# Allegro board 980K2-260817_261115.brd
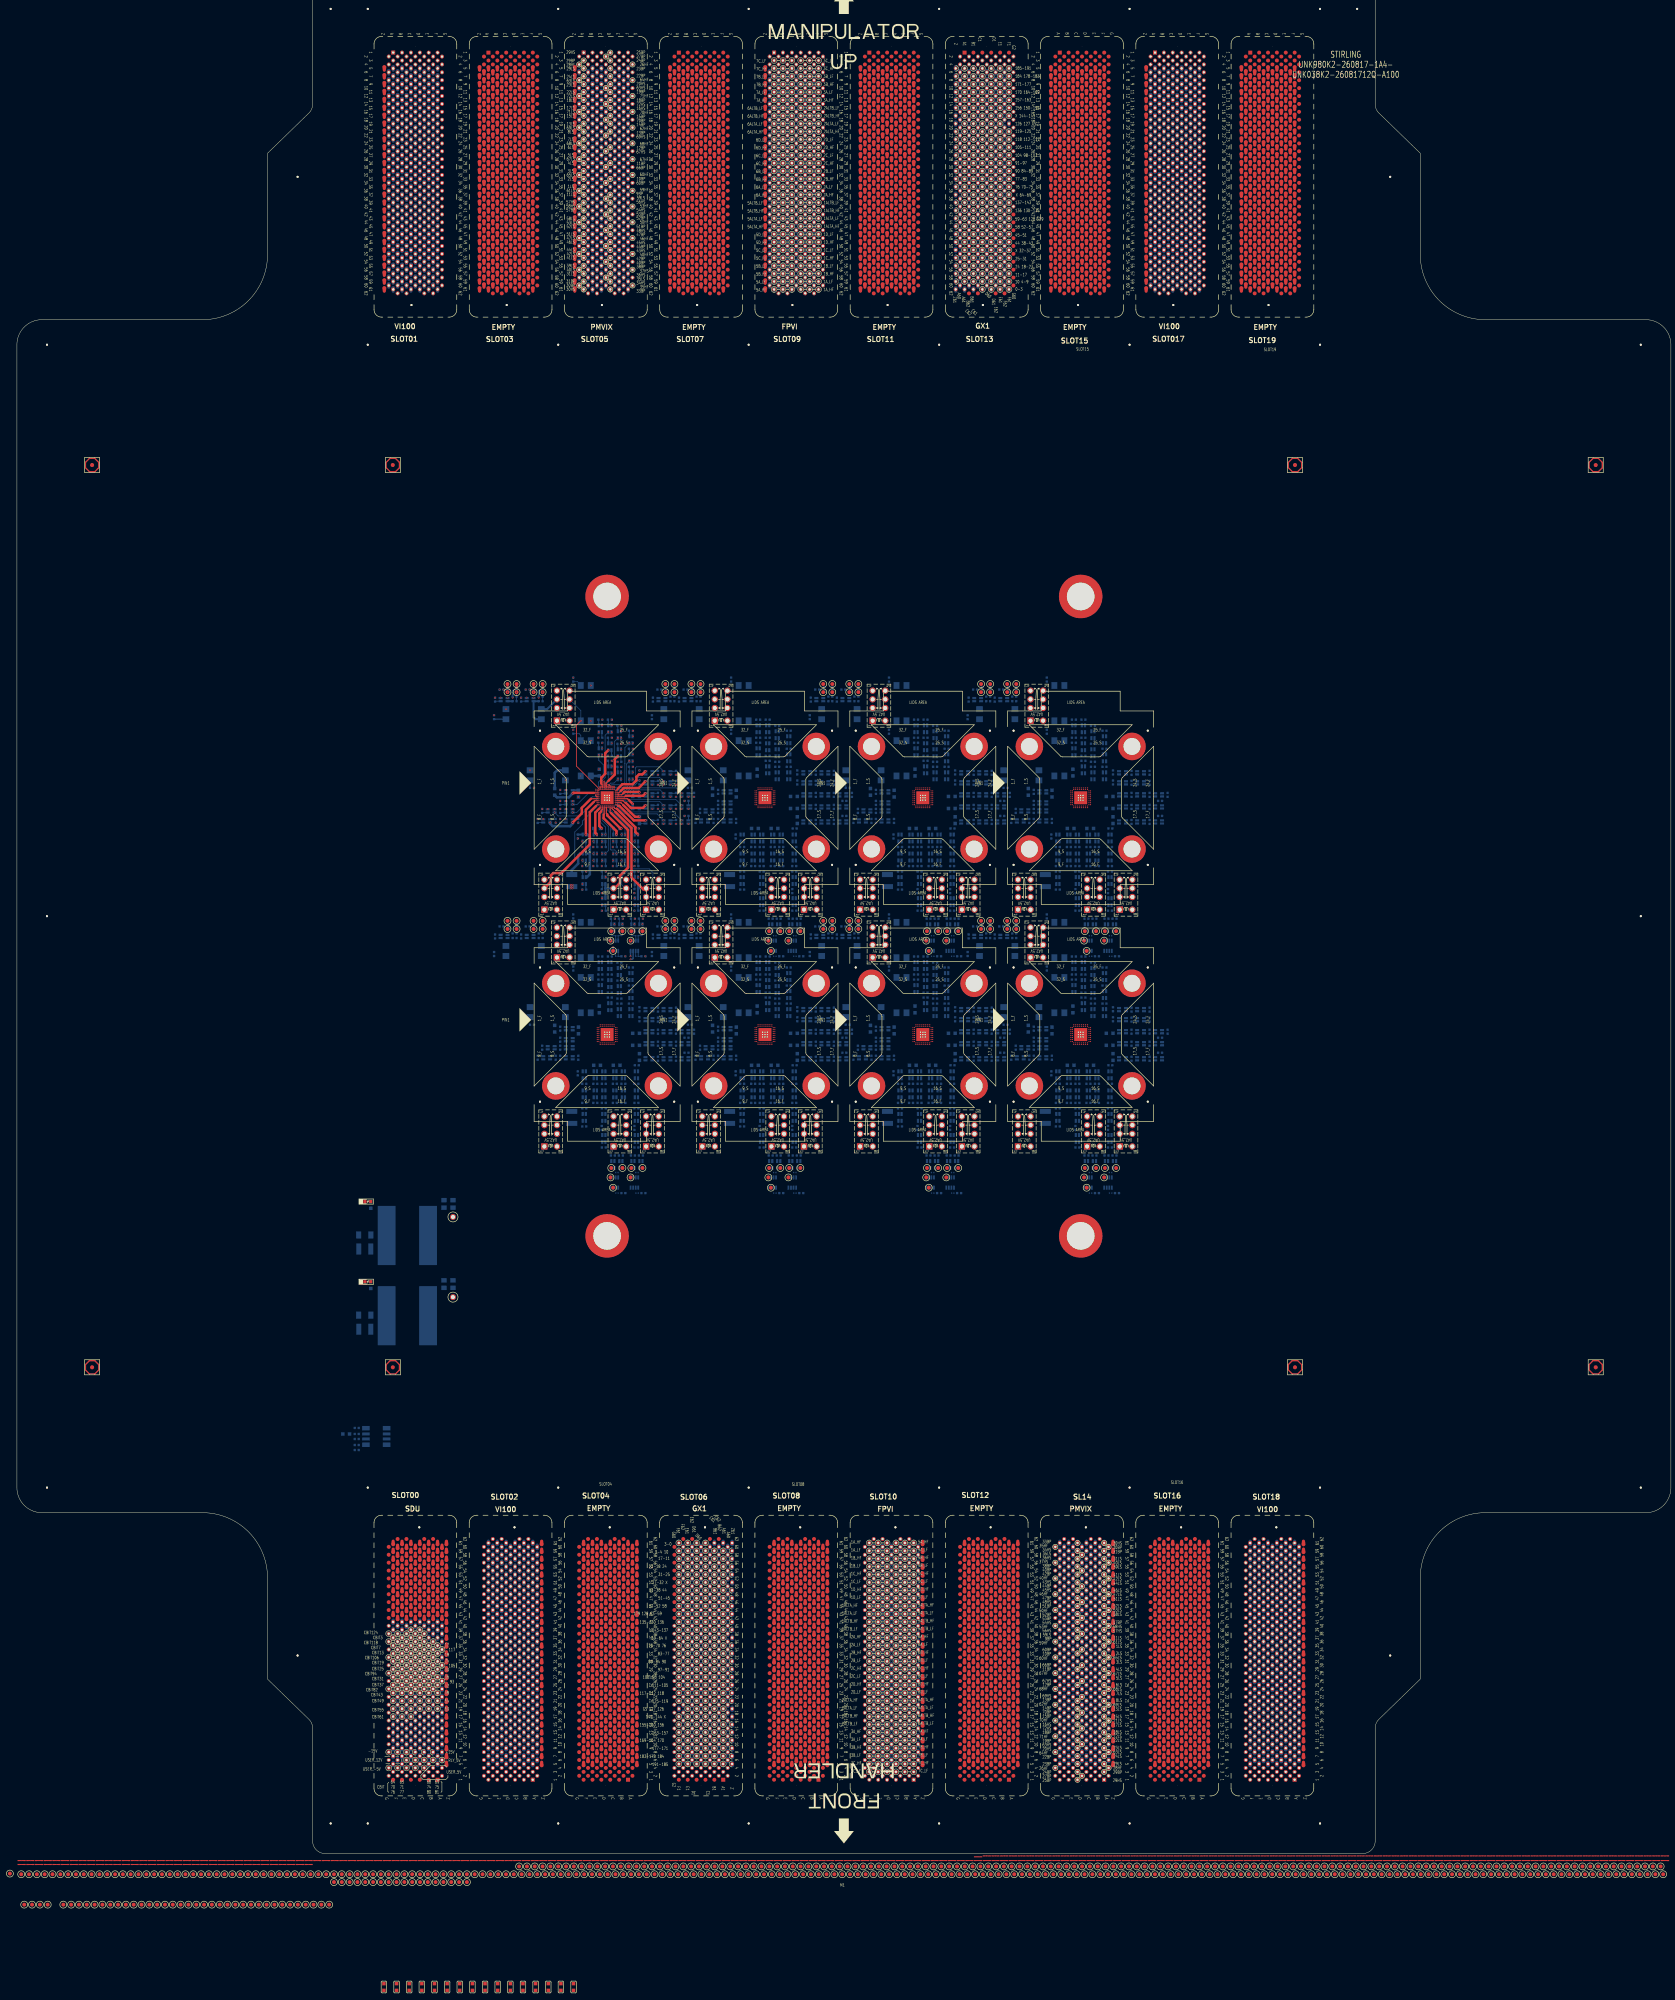
[diagram p0: board, top side]
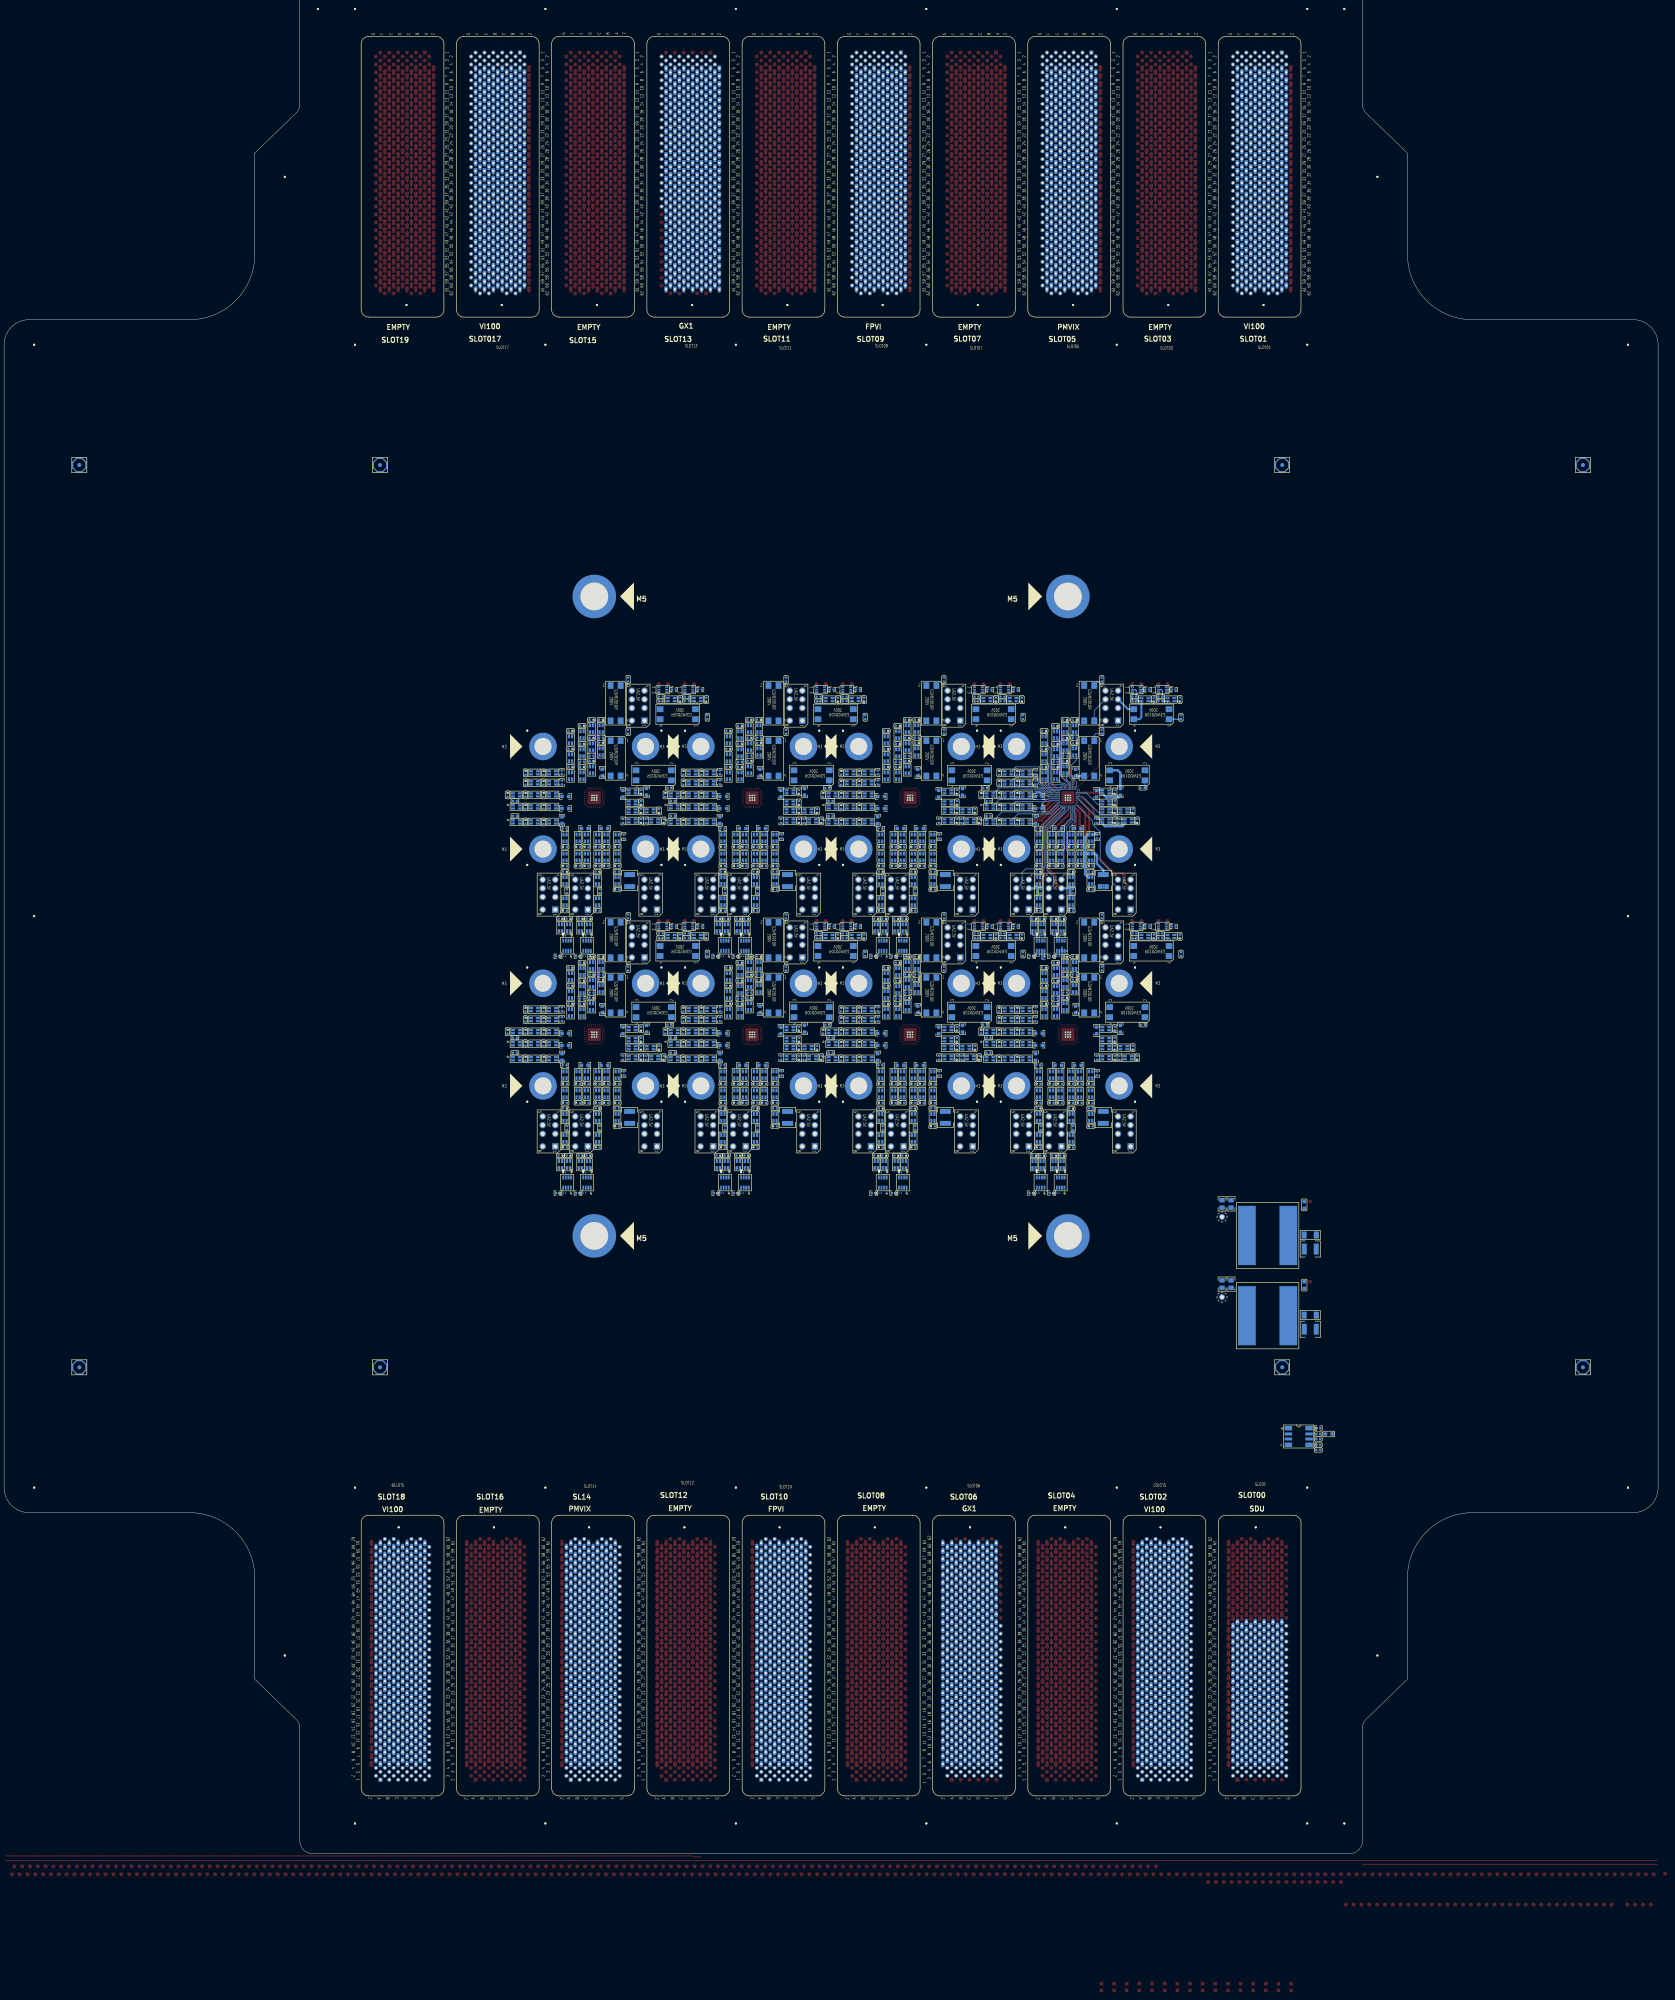
[diagram p1: board, bottom side, seen from below]

Outline 419.1 x 474.98 mm; copper layers: TOP, L02_GND, L03_DP, L04_GND, L05_DP, L06_GND, L07_VI, L08_GND, L09_VI, L10_GND, L11_VI, L12_GND, L13_VI, L14_GND, L15_5V, L16_5V, L17_C-BIT, L18_C-BIT, L19_GND, L20_VI, L21_GND, L22_VI, L23_GND, L24_VI, L25_GND, L26_VI, L27_GND, L28_DP, L29_GND, L30_DP, L31_GND, BOTTOM. Coordinates in mm from the lower left corner of the outline.

## Placement (name value [footprint] x y rotation side)
BC9  0.1U-50-X-S4-TDK  [C0402]  86.11 107.82 180 bottom
BR5  1K-1-S4  [R0402]  86.11 106.3 0 bottom
BR6  1K-1-S4  [R0402]  86.11 103.5 0 bottom
BR7  0-5-S6  [R0603]  83.44 106.3 180 bottom
BR8  0-5-S4  [R0402]  86.11 105.03 180 bottom
BR9  0-5-S4  [R0402]  86.11 102.24 180 bottom
BU1  AT24C512C-SSHM-T-SOIC8  [SO8_206X127MM]  91.06 105.66 180 bottom
C48  0.01U-100-X7R-S6-MU  [C0603]  147.57 273.87 90 bottom
C49  0.01U-100-X7R-S6-MU  [C0603]  136.27 268.99 270 bottom
C50  0.01U-100-X7R-S6-MU  [C0603]  142.28 268.54 270 bottom
C53  1U-16-X5R-S4-YA  [C0402]  142.24 261.62 270 bottom
C54  2.2U-16-X-S4-MU  [C0402]  136.53 261.62 270 bottom
C58  1U-16-X5R-S4-YA  [C0402]  142.11 257.68 270 bottom
C59  4.7U-100-X-SB-MU  [C1210]  140.59 246.51 270 bottom
C60  0.01U-100-X7R-S6-MU  [C0603]  147.01 259.72 0 bottom
C61  0.01U-100-X7R-S6-MU  [C0603]  156.88 264.78 180 bottom
C62  2.2U-16-X-S4-MU  [C0402]  157.07 259.72 0 bottom
C63  0.01U-100-X7R-S6-MU  [C0603]  157.73 261.82 90 bottom
C64  0.01U-100-X7R-S6-MU  [C0603]  156.88 267.82 180 bottom
C65  0.1U-25-X7R-S4-MU  [C0402]  157.73 271.37 90 bottom
C66  0.1U-25-X7R-S4-MU  [C0402]  152.65 276.61 180 bottom
C67  0.1U-25-X7R-S4-MU  [C0402]  150.24 278.13 180 bottom
C68  0.1U-25-X7R-S4-MU  [C0402]  147.83 282.7 180 bottom
C69  0.01U-100-X7R-S6-MU  [C0603]  151.96 259.72 0 bottom
C70  0.1U-25-X7R-S4-MU  [C0402]  122.8 294.89 180 bottom
C71  0.1U-25-X7R-S4-MU  [C0402]  129.42 294.89 180 bottom
C72  0.1U-25-X7R-S4-MU  [C0402]  158.75 227.33 0 bottom
C73  0.1U-25-X7R-S4-MU  [C0402]  153.67 227.33 0 bottom
C74  0.1U-25-X7R-S4-MU  [C0402]  157.73 273.91 90 bottom
CT1  47U-16-X5R-SB-MU  [C1210]  88.14 153.16 180 bottom
CT2  10U-16-X5R-S8-TY  [C0805]  108.2 164.59 90 bottom
CT3  22U-16-X-S8-MU  [C0805]  110.49 164.59 90 bottom
CT7  47U-16-X5R-SB-MU  [C1210]  88.14 132.84 180 bottom
CT8  10U-16-X5R-S8-TY  [C0805]  110.49 144.27 90 bottom
CT9  22U-16-X-S8-MU  [C0805]  108.2 144.27 90 bottom
F1  C1F8-0.25A-SA  [FUSE_1206_H1P05MM]  88.14 156.72 0 bottom
F2  C1F8-0.25A-SA  [FUSE_1206_H1P05MM]  88.14 136.4 0 bottom
FD1  -  [FD_040_V2]  95.25 123.19 0 top
FD2  -  [FD_040_V2]  323.85 123.19 0 top
FD3  -  [FD_040_V2]  323.85 351.79 0 top
FD4  -  [FD_040_V2]  95.25 351.79 0 top
FD5  -  [FD_040_V2]  323.85 123.19 180 bottom
FD6  -  [FD_040_V2]  95.25 123.19 180 bottom
FD7  -  [FD_040_V2]  95.25 351.79 180 bottom
FD8  -  [FD_040_V2]  323.85 351.79 180 bottom
FD9  -  [FD_040_V2]  19.05 123.19 0 top
FD10  -  [FD_040_V2]  400.05 123.19 0 top
FD11  -  [FD_040_V2]  400.05 351.79 0 top
FD12  -  [FD_040_V2]  19.05 351.79 0 top
FD13  -  [FD_040_V2]  400.05 123.19 180 bottom
FD14  -  [FD_040_V2]  19.05 123.19 180 bottom
FD15  -  [FD_040_V2]  19.05 351.79 180 bottom
FD16  -  [FD_040_V2]  400.05 351.79 180 bottom
K1  UA2-5NJ-A-V3  [RL_NECUA2_5V_V3]  138.43 290.63 270 bottom
K2  G3VM-201DR  [RL_G3VM201DR_200V]  144.15 277.5 0 bottom
K3  G3VM-201DR  [RL_G3VM201DR_200V]  134.49 273.18 90 bottom
K4  G3VM-201DR  [RL_G3VM201DR_200V]  144.15 291.47 0 bottom
K5  G3VM-51UR-5V-VSON4  [RL_G3VM_4P_VSON4]  139.95 268.99 0 bottom
K6  G3VM-51UR-5V-VSON4  [RL_G3VM_4P_VSON4]  139.95 266.19 0 bottom
K7  G3VM-51UR-5V-VSON4  [RL_G3VM_4P_VSON4]  139.95 264.16 0 bottom
K8  G3VM-51UR-5V-VSON4  [RL_G3VM_4P_VSON4]  139.95 261.62 0 bottom
K9  G3VM-51UR-5V-VSON4  [RL_G3VM_4P_VSON4]  134.24 261.62 0 bottom
K10  G3VM-51UR-5V-VSON4  [RL_G3VM_4P_VSON4]  135.38 264.16 0 bottom
K11  G3VM-51UR-5V-VSON4  [RL_G3VM_4P_VSON4]  143.76 257.3 90 bottom
K12  G3VM-51UR-5V-VSON4  [RL_G3VM_4P_VSON4]  143.76 252.48 90 bottom
K13  G3VM-51UR-5V-VSON4  [RL_G3VM_4P_VSON4]  143.76 246.51 90 bottom
K14  G3VM-51UR-5V-VSON4  [RL_G3VM_4P_VSON4]  146.56 252.48 90 bottom
K15  UA2-5NJ-A-V3  [RL_NECUA2_5V_V3]  135.25 242.75 270 bottom
K16  G3VM-51UR-5V-VSON4  [RL_G3VM_4P_VSON4]  146.56 257.3 90 bottom
K17  G3VM-51UR-5V-VSON4  [RL_G3VM_4P_VSON4]  148.72 257.3 90 bottom
K18  G3VM-51UR-5V-VSON4  [RL_G3VM_4P_VSON4]  148.72 252.48 90 bottom
K19  G3VM-51UR-5V-VSON4  [RL_G3VM_4P_VSON4]  151.51 257.3 90 bottom
K20  G3VM-51UR-5V-VSON4  [RL_G3VM_4P_VSON4]  151.51 252.48 90 bottom
K21  G3VM-51UR-5V-VSON4  [RL_G3VM_4P_VSON4]  153.67 257.3 90 bottom
K22  G3VM-51UR-5V-VSON4  [RL_G3VM_4P_VSON4]  153.67 252.48 90 bottom
K23  UA2-5NJ-A-V3  [RL_NECUA2_5V_V3]  152.78 242.75 270 bottom
K24  UA2-5NJ-A-V3  [RL_NECUA2_5V_V3]  161.04 242.75 270 bottom
K25  G3VM-51UR-5V-VSON4  [RL_G3VM_4P_VSON4]  156.97 257.3 90 bottom
K26  G3VM-51UR-5V-VSON4  [RL_G3VM_4P_VSON4]  156.97 252.48 90 bottom
K27  G3VM-51UR-5V-VSON4  [RL_G3VM_4P_VSON4]  160.15 261.37 180 bottom
K28  G3VM-51UR-5V-VSON4  [RL_G3VM_4P_VSON4]  164.72 261.37 180 bottom
K29  G3VM-51UR-5V-VSON4  [RL_G3VM_4P_VSON4]  169.29 261.37 180 bottom
K30  G3VM-51UR-5V-VSON4  [RL_G3VM_4P_VSON4]  160.15 265.18 180 bottom
K31  G3VM-51UR-5V-VSON4  [RL_G3VM_4P_VSON4]  164.72 265.18 180 bottom
K32  G3VM-51UR-5V-VSON4  [RL_G3VM_4P_VSON4]  169.29 265.18 180 bottom
K33  G3VM-51UR-5V-VSON4  [RL_G3VM_4P_VSON4]  160.15 268.22 180 bottom
K34  G3VM-51UR-5V-VSON4  [RL_G3VM_4P_VSON4]  164.72 268.22 180 bottom
K35  G3VM-51UR-5V-VSON4  [RL_G3VM_4P_VSON4]  169.29 268.22 180 bottom
K36  G3VM-51UR-5V-VSON4  [RL_G3VM_4P_VSON4]  160.15 271.27 180 bottom
K37  G3VM-51UR-5V-VSON4  [RL_G3VM_4P_VSON4]  164.72 271.27 180 bottom
K38  G3VM-51UR-5V-VSON4  [RL_G3VM_4P_VSON4]  160.15 273.81 180 bottom
K39  G3VM-51UR-5V-VSON4  [RL_G3VM_4P_VSON4]  164.72 273.81 180 bottom
K40  G3VM-51UR-5V-VSON4  [RL_G3VM_4P_VSON4]  155.58 273.05 270 bottom
K41  G3VM-51UR-5V-VSON4  [RL_G3VM_4P_VSON4]  155.58 277.62 270 bottom
K42  G3VM-51UR-5V-VSON4  [RL_G3VM_4P_VSON4]  155.58 282.19 270 bottom
K43  G3VM-51UR-5V-VSON4  [RL_G3VM_4P_VSON4]  152.65 273.05 270 bottom
K44  G3VM-51UR-5V-VSON4  [RL_G3VM_4P_VSON4]  152.65 278.89 270 bottom
K45  G3VM-51UR-5V-VSON4  [RL_G3VM_4P_VSON4]  152.65 283.46 270 bottom
K46  G3VM-51UR-5V-VSON4  [RL_G3VM_4P_VSON4]  150.24 274.57 270 bottom
K47  G3VM-51UR-5V-VSON4  [RL_G3VM_4P_VSON4]  150.24 280.42 270 bottom
K48  G3VM-51UR-5V-VSON4  [RL_G3VM_4P_VSON4]  150.24 284.99 270 bottom
K49  G3VM-51UR-5V-VSON4  [RL_G3VM_4P_VSON4]  147.83 284.99 270 bottom
K50  G3VM-51UR-5V-VSON4  [RL_G3VM_4P_VSON4]  147.83 279.15 270 bottom
K51  G3VM-51UR-5V-VSON4  [RL_G3VM_4P_VSON4]  148.72 246.51 270 bottom
K52  G3VM-51UR-5V-VSON4  [RL_G3VM_4P_VSON4]  148.72 241.17 90 bottom
K53  G3VM-51UR-5V-VSON4  [RL_G3VM_4P_VSON4]  156.97 246.51 270 bottom
K54  G3VM-51UR-5V-VSON4  [RL_G3VM_4P_VSON4]  156.97 241.17 90 bottom
K55  G3VM-51UR-5V-VSON4  [RL_G3VM_4P_VSON4]  123.44 292.35 0 bottom
K56  G3VM-201DR  [RL_G3VM201DR_200V]  128.4 288.67 90 bottom
K57  G3VM-51UR-5V-VSON4  [RL_G3VM_4P_VSON4]  158.12 234.57 270 bottom
K58  G3VM-51UR-5V-VSON4  [RL_G3VM_4P_VSON4]  156.08 234.57 270 bottom
K59  G3VM-51UR-5V-VSON4  [RL_G3VM_4P_VSON4]  153.04 234.57 270 bottom
K60  G3VM-51UR-5V-VSON4  [RL_G3VM_4P_VSON4]  151 234.57 270 bottom
K61  G3VM-51UR-5V-VSON4  [RL_G3VM_4P_VSON4]  130.05 292.35 0 bottom
LD1  LDG-2-S6  [LED_0603]  88.91 165.19 0 top
LD3  LDG-2-S6  [LED_0603]  88.91 144.87 0 top
LT1  L10U-16A-S16.5X15.5-PU  [IND_16P5X15P5MM]  98.93 156.59 0 bottom
LT3  L10U-16A-S16.5X15.5-PU  [IND_16P5X15P5MM]  98.93 136.27 0 bottom
M1  PG_LTXDX_F_X1_OUTLINE_TD_V2  [PG_LTXDX_F_X1_OUTLINE_TD_COHU]  209.55 237.49 0 top
NOREF  -  []  233.98 238.07 0 top
NOREF#2  -  []  199.27 261.77 0 top
NOREF#3  -  []  259.08 208.59 0 top
NOREF#4  -  []  228.32 193.35 0 top
NOREF#5  -  []  255.02 208.14 90 top
NOREF#6  -  []  254.43 292.23 0 top
NOREF#7  -  []  231.18 179.15 0 top
NOREF#8  -  []  270.56 197.6 0 top
NOREF#9  -  []  245.04 233.3 90 top
NOREF#10  -  []  233.18 184.35 0 top
NOREF#11  -  []  152.63 233.69 90 top
NOREF#12  -  []  153.18 222.26 90 top
NOREF#13  -  []  258.35 264.47 0 top
NOREF#14  -  []  196.02 252.78 0 top
NOREF#15  -  []  267.77 197.6 0 top
NOREF#16  -  []  254.43 232.23 0 top
NOREF#17  -  []  214.38 264.09 0 top
NOREF#18  -  []  232.25 278.02 0 top
NOREF#19  -  []  277.71 173.69 0 top
NOREF#20  -  []  156.8 225.06 90 top
NOREF#21  -  []  183.49 193.03 90 top
NOREF#22  -  []  188.35 217.95 90 top
NOREF#23  -  []  150.6 173.69 0 top
NOREF#24  -  []  201.12 188.11 90 top
NOREF#25  -  []  180.95 204.09 90 top
NOREF#26  -  []  152.25 278.02 0 top
NOREF#27  -  []  159.27 260.97 90 top
NOREF#28  -  []  212.55 190.49 90 top
NOREF#29  -  []  184.16 196.43 90 top
NOREF#30  -  []  195.92 190.88 90 top
NOREF#31  -  []  187.03 231.4 0 top
NOREF#32  -  []  127.98 226.38 90 top
NOREF#33  -  []  259.73 178.35 0 top
NOREF#34  -  []  80.49 135.25 0 top
NOREF#35  -  []  283.84 211.67 0 top
NOREF#36  -  []  228.44 257.85 90 top
NOREF#37  -  []  199.72 283.79 90 top
NOREF#38  -  []  163.92 229.94 0 top
NOREF#39  -  []  228.32 185.63 0 top
NOREF#40  -  []  216.26 263.76 90 top
NOREF#41  -  []  276.57 245.63 0 top
NOREF#42  -  []  151.79 256.75 0 top
NOREF#43  -  []  152.25 222.59 90 top
NOREF#44  -  []  258.85 181.15 90 top
NOREF#45  -  []  239.27 274.21 0 top
NOREF#46  -  []  209.52 264.23 90 top
NOREF#47  -  []  276.81 232.54 0 top
NOREF#48  -  []  272.66 166.36 90 top
NOREF#49  -  []  190.77 283.79 90 top
NOREF#50  -  []  154.39 226.59 90 top
NOREF#51  -  []  236.54 167 0 top
NOREF#52  -  []  192.25 212.18 0 top
NOREF#53  -  []  154.51 259.27 90 top
NOREF#54  -  []  124.44 292.28 90 top
NOREF#55  -  []  154.07 191.6 90 top
NOREF#56  -  []  279.65 272.56 0 top
NOREF#57  -  []  281.44 244.35 0 top
NOREF#58  -  []  156.57 245.63 0 top
NOREF#59  -  []  136.55 220.49 0 top
NOREF#60  -  []  251.05 289.49 0 top
NOREF#61  -  []  253.64 239.09 0 top
NOREF#62  -  []  189.84 284.11 0 top
NOREF#63  -  []  223.36 253.35 0 top
NOREF#64  -  []  186.7 283.04 90 top
NOREF#65  -  []  136.98 205.11 90 top
NOREF#66  -  []  271.71 171.3 0 top
NOREF#67  -  []  219.73 178.35 0 top
NOREF#68  -  []  156.81 172.54 0 top
NOREF#69  -  []  216.55 280.49 0 top
NOREF#70  -  []  197.37 251.6 90 top
NOREF#71  -  []  84.45 359.42 0 top
NOREF#72  -  []  202.44 232.28 0 top
NOREF#73  -  []  239.27 271.67 0 top
NOREF#74  -  []  249.52 272.86 90 top
NOREF#75  -  []  158.89 259.3 0 top
NOREF#76  -  []  186.16 212.17 90 top
NOREF#77  -  []  266.28 253.03 90 top
NOREF#78  -  []  182.81 257.6 0 top
NOREF#79  -  []  224.04 196.75 0 top
NOREF#80  -  []  222.87 273.02 0 top
NOREF#81  -  []  276.52 276.55 0 top
NOREF#82  -  []  173.65 179.15 0 top
NOREF#83  -  []  155.17 272.17 90 top
NOREF#84  -  []  253.62 289.09 90 top
NOREF#85  -  []  151.11 198.18 0 top
NOREF#86  -  []  157.59 235.77 0 top
NOREF#87  -  []  180.83 263.76 90 top
NOREF#88  -  []  163.84 201.77 0 top
NOREF#89  -  []  269.24 185.31 90 top
NOREF#90  -  []  145.42 226.99 90 top
NOREF#91  -  []  138.97 271.91 90 top
NOREF#92  -  []  159.4 214.54 0 top
NOREF#93  -  []  270.41 228.7 90 top
NOREF#94  -  []  189.12 240.3 90 top
NOREF#95  -  []  186.7 237.02 90 top
NOREF#96  -  []  194.39 222.02 90 top
NOREF#97  -  []  128.94 265.53 0 top
NOREF#98  -  []  288.42 201.77 0 top
NOREF#99  -  []  152.25 218.02 0 top
NOREF#100  -  []  226.01 195.7 90 top
NOREF#101  -  []  286.32 212.22 0 top
NOREF#102  -  []  264.26 456.29 0 top
NOREF#103  -  []  321.52 456.29 0 top
NOREF#104  -  []  149.12 191.6 90 top
NOREF#105  -  []  230.77 273.37 90 top
NOREF#106  -  []  140.83 208.59 90 top
NOREF#107  -  []  284.95 267.27 90 top
NOREF#108  -  []  157.18 176.17 90 top
NOREF#109  -  []  267.43 224.11 90 top
NOREF#110  -  []  227.45 209.24 0 top
NOREF#111  -  []  226.16 226.14 90 top
NOREF#112  -  []  159.4 210.55 90 top
NOREF#113  -  []  277.25 256.75 0 top
NOREF#114  -  []  135.11 201.22 90 top
NOREF#115  -  []  147.43 218.27 90 top
NOREF#116  -  []  159.4 268.95 0 top
NOREF#117  -  []  266.16 200.17 90 top
NOREF#118  -  []  272.63 173.69 90 top
NOREF#119  -  []  148.32 182.05 0 top
NOREF#120  -  []  197.37 240.3 90 top
NOREF#121  -  []  232.63 172.86 0 top
NOREF#122  -  []  189.67 250.01 0 top
NOREF#123  -  []  203.84 214.21 0 top
NOREF#124  -  []  86.61 153.16 0 top
NOREF#125  -  []  209.52 204.23 90 top
NOREF#126  -  []  276.52 281.12 0 top
NOREF#127  -  []  191.79 256.75 0 top
NOREF#128  -  []  150.56 252.5 0 top
NOREF#129  -  []  149.12 196.43 90 top
NOREF#130  -  []  151.95 178.07 0 top
NOREF#131  -  []  294.09 207.27 90 top
NOREF#132  -  []  244.95 270.32 90 top
NOREF#133  -  []  211.21 234.24 90 top
NOREF#134  -  []  275.05 278.82 0 top
NOREF#135  -  []  162.87 16.49 0 top
NOREF#136  -  []  147.45 269.24 0 top
NOREF#137  -  []  187.8 205.39 90 top
NOREF#138  -  []  158.04 228.3 0 top
NOREF#139  -  []  232.25 272.17 0 top
NOREF#140  -  []  267.43 224.11 0 top
NOREF#141  -  []  187.01 458.49 0 top
NOREF#142  -  []  233.83 172.21 90 top
NOREF#143  -  []  212.64 204.47 0 top
NOREF#144  -  []  152.51 235.77 0 top
NOREF#145  -  []  275.92 255.7 90 top
NOREF#146  -  []  235.92 250.88 90 top
NOREF#147  -  []  148.99 191.93 0 top
NOREF#148  -  []  168.94 221.73 0 top
NOREF#149  -  []  129.17 291.95 0 top
NOREF#150  -  []  139.08 265.79 0 top
NOREF#151  -  []  152.61 456.29 0 top
NOREF#152  -  []  266.16 198.18 0 top
NOREF#153  -  []  201.75 274.76 0 top
NOREF#154  -  []  279.4 202.09 0 top
NOREF#155  -  []  157.71 233.69 90 top
NOREF#156  -  []  89.76 144.42 90 top
NOREF#157  -  []  276.7 181.72 90 top
NOREF#158  -  []  233.39 253.03 90 top
NOREF#159  -  []  191.19 228.49 0 top
NOREF#160  -  []  218.95 268.91 0 top
NOREF#161  -  []  204.32 291.95 90 top
NOREF#162  -  []  167.04 299.09 0 top
NOREF#163  -  []  147.05 209.24 0 top
NOREF#164  -  []  121.84 235.2 0 top
NOREF#165  -  []  231.19 278.07 0 top
NOREF#166  -  []  139.55 294.49 0 top
NOREF#167  -  []  163.84 208.62 0 top
NOREF#168  -  []  209.55 237.49 0 top
NOREF#169  -  []  239.44 179.15 0 top
NOREF#170  -  []  228.32 242.05 0 top
NOREF#171  -  []  281.12 248.11 90 top
NOREF#172  -  []  228.19 187.71 0 top
NOREF#173  -  []  179.55 234.49 0 top
NOREF#174  -  []  146.28 197.85 90 top
NOREF#175  -  []  281.12 188.11 90 top
NOREF#176  -  []  216.63 292.23 0 top
NOREF#177  -  []  226.96 191.6 90 top
NOREF#178  -  []  152.72 252.5 0 top
NOREF#179  -  []  216.83 227.03 0 top
NOREF#180  -  []  203.84 260.97 90 top
NOREF#181  -  []  275.56 235.77 0 top
NOREF#182  -  []  233.18 244.35 0 top
NOREF#183  -  []  89.74 155.92 0 top
NOREF#184  -  []  163.84 273.41 90 top
NOREF#185  -  []  158.91 172.21 90 top
NOREF#186  -  []  264.16 185.63 90 top
NOREF#187  -  []  236.79 171.3 0 top
NOREF#188  -  []  244.95 267.27 90 top
NOREF#189  -  []  147.8 205.39 90 top
NOREF#190  -  []  243.97 200.64 90 top
NOREF#191  -  []  218.35 264.47 0 top
NOREF#192  -  []  154.63 286.99 0 top
NOREF#193  -  []  193.18 222.26 90 top
NOREF#194  -  []  144.04 245.96 0 top
NOREF#195  -  []  116.51 14.59 90 top
NOREF#196  -  []  178.95 201.55 0 top
NOREF#197  -  []  279.4 268.95 0 top
NOREF#198  -  []  246.32 269.17 0 top
NOREF#199  -  []  190.41 228.7 90 top
NOREF#200  -  []  123.4 281.8 0 top
NOREF#201  -  []  260.43 224.38 90 top
NOREF#202  -  []  195.68 233.69 90 top
NOREF#203  -  []  249.52 267.27 90 top
NOREF#204  -  []  89.74 155.92 90 top
NOREF#205  -  []  154.07 251.6 90 top
NOREF#206  -  []  273.94 256.75 0 top
NOREF#207  -  []  186.16 200.17 90 top
NOREF#208  -  []  283.97 205.9 0 top
NOREF#209  -  []  236.79 231.3 0 top
NOREF#210  -  []  226.43 236.47 90 top
NOREF#211  -  []  288.39 456.29 0 top
NOREF#212  -  []  129.49 220.89 0 top
NOREF#213  -  []  246.32 262.32 0 top
NOREF#214  -  []  275.92 190.88 90 top
NOREF#215  -  []  272.13 284.66 0 top
NOREF#216  -  []  145.61 252.5 0 top
NOREF#217  -  []  199.27 207.82 90 top
NOREF#218  -  []  187.43 278.27 0 top
NOREF#219  -  []  265.61 252.78 0 top
NOREF#220  -  []  205.38 286.23 0 top
NOREF#221  -  []  240.11 18.69 0 top
NOREF#222  -  []  187.77 197.6 0 top
NOREF#223  -  []  188.99 180.62 0 top
NOREF#224  -  []  231.79 251.93 0 top
NOREF#225  -  []  196.33 167.9 90 top
NOREF#226  -  []  234.07 191.6 90 top
NOREF#227  -  []  193.83 172.21 90 top
NOREF#228  -  []  234.39 216.17 90 top
NOREF#229  -  []  235.92 190.88 90 top
NOREF#230  -  []  209.55 237.49 0 top
NOREF#231  -  []  153.6 216.55 0 top
NOREF#232  -  []  275.58 202.67 90 top
NOREF#233  -  []  141.55 209.94 90 top
NOREF#234  -  []  227.43 284.11 90 top
NOREF#235  -  []  219.08 205.79 0 top
NOREF#236  -  []  278.13 389.27 90 top
NOREF#237  -  []  161.75 269.17 0 top
NOREF#238  -  []  186.96 251.6 90 top
NOREF#239  -  []  191.19 283.92 0 top
NOREF#240  -  []  248.94 281.73 0 top
NOREF#241  -  []  78.11 0 90 top
NOREF#242  -  []  109.54 14.59 90 top
NOREF#243  -  []  265.09 197.49 90 top
NOREF#244  -  []  248.42 208.62 0 top
NOREF#245  -  []  182.81 197.6 0 top
NOREF#246  -  []  269.72 226.19 0 top
NOREF#247  -  []  323.77 454.29 90 top
NOREF#248  -  []  283.97 202.09 0 top
NOREF#249  -  []  184.04 191.93 0 top
NOREF#250  -  []  193.56 233.37 90 top
NOREF#251  -  []  290.89 266.13 0 top
NOREF#252  -  []  271.91 191.6 90 top
NOREF#253  -  []  243.4 296.38 0 top
NOREF#254  -  []  221.55 262.57 90 top
NOREF#255  -  []  151.79 196.75 0 top
NOREF#256  -  []  268.78 184.35 0 top
NOREF#257  -  []  214.09 200.42 90 top
NOREF#258  -  []  134.51 203.76 0 top
NOREF#259  -  []  283.84 268.62 0 top
NOREF#260  -  []  230.56 252.78 0 top
NOREF#261  -  []  264.04 185.96 0 top
NOREF#262  -  []  143.89 185.24 90 top
NOREF#263  -  []  231.24 193.03 90 top
NOREF#264  -  []  174.04 270.63 90 top
NOREF#265  -  []  149.67 247.68 90 top
NOREF#266  -  []  243.84 207.82 90 top
NOREF#267  -  []  271.79 191.93 0 top
NOREF#268  -  []  178.35 209.04 0 top
NOREF#269  -  []  169.52 272.86 90 top
NOREF#270  -  []  256.83 287.03 0 top
NOREF#271  -  []  180.83 268.59 90 top
NOREF#272  -  []  239.4 273.09 90 top
NOREF#273  -  []  162.88 458.49 0 top
NOREF#274  -  []  235.96 228.6 90 top
NOREF#275  -  []  190.15 206.89 90 top
NOREF#276  -  []  164.95 272.86 90 top
NOREF#277  -  []  144.04 251.93 0 top
NOREF#278  -  []  256.98 265.11 90 top
NOREF#279  -  []  163.84 213.41 90 top
NOREF#280  -  []  213.24 201.55 0 top
NOREF#281  -  []  193.76 190.88 90 top
NOREF#282  -  []  143.61 396.29 0 top
NOREF#283  -  []  168.42 265.58 0 top
NOREF#284  -  []  151.79 191.93 0 top
NOREF#285  -  []  199.4 272 0 top
NOREF#286  -  []  283.97 214.54 0 top
NOREF#287  -  []  254 14.59 90 top
NOREF#288  -  []  213.64 239.09 0 top
NOREF#289  -  []  148.32 245.63 0 top
NOREF#290  -  []  195.17 212.18 0 top
NOREF#291  -  []  141.6 248.12 0 top
NOREF#292  -  []  199.27 273.41 90 top
NOREF#293  -  []  193.27 193.35 0 top
NOREF#294  -  []  255.65 244.35 0 top
NOREF#295  -  []  243.97 267.5 90 top
NOREF#296  -  []  232.25 212.18 90 top
NOREF#297  -  []  276.57 185.63 0 top
NOREF#298  -  []  153.18 211.85 90 top
NOREF#299  -  []  216.98 265.11 90 top
NOREF#300  -  []  268.78 282.65 0 top
NOREF#301  -  []  148.81 195.7 90 top
NOREF#302  -  []  189.12 180.3 90 top
NOREF#303  -  []  188.99 191.93 0 top
NOREF#304  -  []  233.56 233.37 90 top
NOREF#305  -  []  205.04 293.3 90 top
NOREF#306  -  []  193.39 253.03 90 top
NOREF#307  -  []  248.42 200.97 90 top
NOREF#308  -  []  118.64 291.4 0 top
NOREF#309  -  []  193.76 250.88 90 top
NOREF#310  -  []  190.56 192.78 0 top
NOREF#311  -  []  144.04 196.75 0 top
NOREF#312  -  []  193.56 173.37 90 top
NOREF#313  -  []  266.69 283.04 90 top
NOREF#314  -  []  219.08 201.22 0 top
NOREF#315  -  []  106.68 128.02 90 top
NOREF#316  -  []  203.84 270.87 90 top
NOREF#317  -  []  135.15 260.67 0 top
NOREF#318  -  []  275.49 18.69 90 top
NOREF#319  -  []  271.79 196.75 0 top
NOREF#320  -  []  156.79 231.3 0 top
NOREF#321  -  []  173.24 201.55 0 top
NOREF#322  -  []  133.36 201.22 0 top
NOREF#323  -  []  209.55 237.49 0 top
NOREF#324  -  []  223.36 198.18 0 top
NOREF#325  -  []  289.52 212.86 90 top
NOREF#326  -  []  279.22 179.57 90 top
NOREF#327  -  []  211.25 184.35 0 top
NOREF#328  -  []  279.24 184.35 0 top
NOREF#329  -  []  273.98 178.07 0 top
NOREF#330  -  []  268.99 196.75 0 top
NOREF#331  -  []  208.54 207.5 90 top
NOREF#332  -  []  243.97 264.45 90 top
NOREF#333  -  []  248.54 205.9 0 top
NOREF#334  -  []  157.74 226.35 90 top
NOREF#335  -  []  155.05 223.39 0 top
NOREF#336  -  []  289.52 200.42 90 top
NOREF#337  -  []  237.25 196.75 0 top
NOREF#338  -  []  199.27 271.67 0 top
NOREF#339  -  []  161.44 184.35 0 top
NOREF#340  -  []  236.57 253.35 0 top
NOREF#341  -  []  234.39 282.02 90 top
NOREF#342  -  []  178.85 241.15 90 top
NOREF#343  -  []  273.6 226.96 0 top
NOREF#344  -  []  256.55 194.49 90 top
NOREF#345  -  []  243.84 204.78 90 top
NOREF#346  -  []  252.55 250.49 90 top
NOREF#347  -  []  229.84 213.7 90 top
NOREF#348  -  []  233.6 282.39 0 top
NOREF#349  -  []  269.84 213.7 90 top
NOREF#350  -  []  269.84 279.54 0 top
NOREF#351  -  []  134.43 292.23 0 top
NOREF#352  -  []  221.6 17.15 0 top
NOREF#353  -  []  156.61 233.37 90 top
NOREF#354  -  []  192.72 252.78 0 top
NOREF#355  -  []  178.35 264.47 0 top
NOREF#356  -  []  224.04 251.93 0 top
NOREF#357  -  []  227.99 238.35 0 top
NOREF#358  -  []  150.98 244.35 0 top
NOREF#359  -  []  203.04 176.5 90 top
NOREF#360  -  []  186.96 196.43 90 top
NOREF#361  -  []  188.99 256.75 0 top
NOREF#362  -  []  275.58 262.67 90 top
NOREF#363  -  []  169.05 232.28 0 top
NOREF#364  -  []  318.12 17.15 90 top
NOREF#365  -  []  228.44 241.72 90 top
NOREF#366  -  []  163.97 200.64 90 top
NOREF#367  -  []  269.55 188.99 90 top
NOREF#368  -  []  267.77 241.47 0 top
NOREF#369  -  []  166.32 209.17 0 top
NOREF#370  -  []  215.84 202.57 90 top
NOREF#371  -  []  134.43 232.23 0 top
NOREF#372  -  []  312.52 456.29 0 top
NOREF#373  -  []  236.38 241.15 90 top
NOREF#374  -  []  141.6 234.15 0 top
NOREF#375  -  []  272.25 218.02 90 top
NOREF#376  -  []  267.05 209.24 0 top
NOREF#377  -  []  216.38 264.09 90 top
NOREF#378  -  []  199.4 200.64 90 top
NOREF#379  -  []  159.65 212.56 0 top
NOREF#380  -  []  253.45 244.35 0 top
NOREF#381  -  []  159.4 207.5 90 top
NOREF#382  -  []  274.33 264.33 90 top
NOREF#383  -  []  199.4 274.54 0 top
NOREF#384  -  []  244.32 231.95 90 top
NOREF#385  -  []  267.3 220.35 0 top
NOREF#386  -  []  243.84 213.41 90 top
NOREF#387  -  []  277.71 233.69 90 top
NOREF#388  -  []  243.84 200.97 90 top
NOREF#389  -  []  168.42 260.97 90 top
NOREF#390  -  []  215.84 262.57 90 top
NOREF#391  -  []  236.57 245.63 90 top
NOREF#392  -  []  283.97 212 0 top
NOREF#393  -  []  239.27 205.58 0 top
NOREF#394  -  []  199.27 210.87 90 top
NOREF#395  -  []  273.94 191.93 0 top
NOREF#396  -  []  232.13 224.66 0 top
NOREF#397  -  []  288.42 264.78 90 top
NOREF#398  -  []  150.88 228.6 90 top
NOREF#399  -  []  191.91 251.6 90 top
NOREF#400  -  []  159.27 265.58 0 top
NOREF#401  -  []  203.97 207.5 90 top
NOREF#402  -  []  140.04 265.53 90 top
NOREF#403  -  []  246.32 214.76 0 top
NOREF#404  -  []  286.32 274.76 0 top
NOREF#405  -  []  157.71 172.86 0 top
NOREF#406  -  []  288.37 18.69 0 top
NOREF#407  -  []  232.25 218.02 0 top
NOREF#408  -  []  214.43 232.23 0 top
NOREF#409  -  []  180.83 261.22 90 top
NOREF#410  -  []  176.55 194.49 90 top
NOREF#411  -  []  245.38 226.23 0 top
NOREF#412  -  []  129.05 292.28 0 top
NOREF#413  -  []  279.44 239.15 0 top
NOREF#414  -  []  136.5 285.91 0 top
NOREF#415  -  []  231.76 227.33 0 top
NOREF#416  -  []  252.55 284.49 0 top
NOREF#417  -  []  199.24 184.35 0 top
NOREF#418  -  []  268.32 182.05 0 top
NOREF#419  -  []  276.1 220.99 90 top
NOREF#420  -  []  169.52 207.27 90 top
NOREF#421  -  []  227.03 171.4 0 top
NOREF#422  -  []  171.25 244.35 0 top
NOREF#423  -  []  193.03 172.1 0 top
NOREF#424  -  []  248.54 262.09 0 top
NOREF#425  -  []  174.07 210.89 90 top
NOREF#426  -  []  171.05 289.49 0 top
NOREF#427  -  []  150.41 168.7 90 top
NOREF#428  -  []  155.17 216.75 90 top
NOREF#429  -  []  236.52 276.55 0 top
NOREF#430  -  []  147.77 197.6 0 top
NOREF#431  -  []  279.27 200.97 90 top
NOREF#432  -  []  179.72 213.6 90 top
NOREF#433  -  []  281.75 272.22 0 top
NOREF#434  -  []  191.24 253.03 90 top
NOREF#435  -  []  248.54 207.5 90 top
NOREF#436  -  []  129.49 266.31 0 top
NOREF#437  -  []  197.37 256.43 90 top
NOREF#438  -  []  249.52 200.42 90 top
NOREF#439  -  []  149.55 248.99 90 top
NOREF#440  -  []  142.03 289.03 90 top
NOREF#441  -  []  212.87 287.4 90 top
NOREF#442  -  []  190.88 228.6 90 top
NOREF#443  -  []  276.52 221.12 0 top
NOREF#444  -  []  272.25 278.02 90 top
NOREF#445  -  []  138.35 204.47 0 top
NOREF#446  -  []  205.38 286.23 0 top
NOREF#447  -  []  131.05 289.49 0 top
NOREF#448  -  []  197.37 180.3 90 top
NOREF#449  -  []  263.36 198.18 0 top
NOREF#450  -  []  260.43 284.38 90 top
NOREF#451  -  []  251.21 234.89 90 top
NOREF#452  -  []  199.27 200.97 90 top
NOREF#453  -  []  271.46 227 0 top
NOREF#454  -  []  273.18 277.69 90 top
NOREF#455  -  []  85.84 137.3 0 top
NOREF#456  -  []  180.59 184.98 90 top
NOREF#457  -  []  258.35 271.84 0 top
NOREF#458  -  []  226.83 256.75 0 top
NOREF#459  -  []  143.36 247.38 0 top
NOREF#460  -  []  191.71 171.3 0 top
NOREF#461  -  []  274.33 207.37 90 top
NOREF#462  -  []  188.19 187.71 0 top
NOREF#463  -  []  268.78 244.35 0 top
NOREF#464  -  []  226.83 191.93 0 top
NOREF#465  -  []  153.39 257.85 90 top
NOREF#466  -  []  147.77 248.11 90 top
NOREF#467  -  []  186.28 253.03 90 top
NOREF#468  -  []  155.05 218.82 0 top
NOREF#469  -  []  269.84 284.11 90 top
NOREF#470  -  []  233.56 173.37 90 top
NOREF#471  -  []  157.59 175.77 0 top
NOREF#472  -  []  231.95 238.07 0 top
NOREF#473  -  []  153.39 197.85 90 top
NOREF#474  -  []  269.86 17.15 90 top
NOREF#475  -  []  168.42 200.97 90 top
NOREF#476  -  []  235.17 216.75 0 top
NOREF#477  -  []  155.78 237.5 90 top
NOREF#478  -  []  203.1 18.69 90 top
NOREF#479  -  []  149.12 180.3 90 top
NOREF#480  -  []  260.83 263.76 90 top
NOREF#481  -  []  247.04 299.09 0 top
NOREF#482  -  []  157.71 173.69 90 top
NOREF#483  -  []  213.64 299.09 0 top
NOREF#484  -  []  231.24 197.85 90 top
NOREF#485  -  []  165.04 293.3 90 top
NOREF#486  -  []  288.54 200.64 90 top
NOREF#487  -  []  162.2 238.35 0 top
NOREF#488  -  []  260.95 208.91 90 top
NOREF#489  -  []  172.64 204.47 0 top
NOREF#490  -  []  131.22 234.89 90 top
NOREF#491  -  []  288.54 268.95 0 top
NOREF#492  -  []  149.67 190.01 0 top
NOREF#493  -  []  130.92 291.95 90 top
NOREF#494  -  []  153.27 193.35 0 top
NOREF#495  -  []  181.03 267.69 90 top
NOREF#496  -  []  274.07 196.43 90 top
NOREF#497  -  []  266.83 196.75 0 top
NOREF#498  -  []  247.04 239.09 0 top
NOREF#499  -  []  188.95 206.89 0 top
NOREF#500  -  []  83.04 164.54 90 top
NOREF#501  -  []  135.15 265.24 90 top
NOREF#502  -  []  270.77 213.37 90 top
NOREF#503  -  []  277.37 191.6 90 top
NOREF#504  -  []  232.13 274.25 0 top
NOREF#505  -  []  195.92 195.7 90 top
NOREF#506  -  []  199.4 212 0 top
NOREF#507  -  []  258.97 271.91 90 top
NOREF#508  -  []  239.72 279.22 90 top
NOREF#509  -  []  267.8 269.99 0 top
NOREF#510  -  []  223.49 193.03 90 top
NOREF#511  -  []  252.87 287.4 90 top
NOREF#512  -  []  197.25 191.93 0 top
NOREF#513  -  []  209.52 207.27 90 top
NOREF#514  -  []  197.37 191.6 90 top
NOREF#515  -  []  153.98 238.07 0 top
NOREF#516  -  []  271.76 227.33 0 top
NOREF#517  -  []  128.94 221.73 0 top
NOREF#518  -  []  182.81 192.78 0 top
NOREF#519  -  []  88.44 105.03 90 top
NOREF#520  -  []  180.95 201.55 90 top
NOREF#521  -  []  227.9 265.84 90 top
NOREF#522  -  []  185.42 214.72 90 top
NOREF#523  -  []  150.77 213.37 90 top
NOREF#524  -  []  263.36 193.35 0 top
NOREF#525  -  []  283.97 270.55 90 top
NOREF#526  -  []  230.6 173.69 90 top
NOREF#527  -  []  170.89 206.13 0 top
NOREF#528  -  []  193.27 258.18 0 top
NOREF#529  -  []  159.27 261.77 0 top
NOREF#530  -  []  268.99 180.62 0 top
NOREF#531  -  []  239.27 267.82 90 top
NOREF#532  -  []  147.43 284.11 90 top
NOREF#533  -  []  290.89 206.13 0 top
NOREF#534  -  []  232.72 197.6 0 top
NOREF#535  -  []  163.97 210.55 90 top
NOREF#536  -  []  191.95 238.07 0 top
NOREF#537  -  []  174.09 207.27 90 top
NOREF#538  -  []  163.84 210.87 90 top
NOREF#539  -  []  276.54 227 0 top
NOREF#540  -  []  275.96 168.6 90 top
NOREF#541  -  []  166.32 212.22 0 top
NOREF#542  -  []  227.99 178.35 0 top
NOREF#543  -  []  156.57 253.35 0 top
NOREF#544  -  []  227.43 218.27 90 top
NOREF#545  -  []  148.78 184.35 0 top
NOREF#546  -  []  196.52 225.69 0 top
NOREF#547  -  []  85.84 157.62 0 top
NOREF#548  -  []  156.8 214.65 90 top
NOREF#549  -  []  243.97 260.64 90 top
NOREF#550  -  []  229.84 213.7 0 top
NOREF#551  -  []  161.75 266.13 0 top
NOREF#552  -  []  229.72 281.62 0 top
NOREF#553  -  []  203.97 214.54 0 top
NOREF#554  -  []  93.68 156.59 0 top
NOREF#555  -  []  188.81 195.7 90 top
NOREF#556  -  []  268.44 253.03 90 top
NOREF#557  -  []  168.54 262.09 0 top
NOREF#558  -  []  163.97 208.95 0 top
NOREF#559  -  []  192.25 282.59 0 top
NOREF#560  -  []  276.8 280.49 90 top
NOREF#561  -  []  274.07 191.6 90 top
NOREF#562  -  []  262.81 257.6 0 top
NOREF#563  -  []  209.55 237.49 90 top
NOREF#564  -  []  234.39 286.59 90 top
NOREF#565  -  []  269.12 251.6 90 top
NOREF#566  -  []  238.64 173.37 90 top
NOREF#567  -  []  149.56 259.27 90 top
NOREF#568  -  []  146.28 257.85 90 top
NOREF#569  -  []  236.1 271.85 90 top
NOREF#570  -  []  199.44 239.15 0 top
NOREF#571  -  []  220.95 261.55 90 top
NOREF#572  -  []  146.28 253.03 90 top
NOREF#573  -  []  179.08 203.76 0 top
NOREF#574  -  []  159.72 214.65 90 top
NOREF#575  -  []  155.05 214.25 0 top
NOREF#576  -  []  154.33 207.37 90 top
NOREF#577  -  []  191.11 200.17 90 top
NOREF#578  -  []  151.19 218.07 0 top
NOREF#579  -  []  88.14 151.13 90 top
NOREF#580  -  []  208.54 200.64 90 top
NOREF#581  -  []  277.25 251.93 0 top
NOREF#582  -  []  195.05 278.82 0 top
NOREF#583  -  []  187.99 238.35 0 top
NOREF#584  -  []  196.57 193.35 0 top
NOREF#585  -  []  183.49 247.06 90 top
NOREF#586  -  []  273.56 173.37 90 top
NOREF#587  -  []  269.72 221.62 0 top
NOREF#588  -  []  149.67 236.37 90 top
NOREF#589  -  []  213.36 201.22 0 top
NOREF#590  -  []  270.77 273.37 90 top
NOREF#591  -  []  321.5 18.69 0 top
NOREF#592  -  []  273.18 282.26 90 top
NOREF#593  -  []  281.75 202.32 0 top
NOREF#594  -  []  273.76 250.88 90 top
NOREF#595  -  []  283.97 267.5 90 top
NOREF#596  -  []  174.09 204.23 90 top
NOREF#597  -  []  188.78 184.35 0 top
NOREF#598  -  []  152.72 197.6 0 top
NOREF#599  -  []  129.36 361.96 0 top
NOREF#600  -  []  279.44 179.15 0 top
NOREF#601  -  []  229.84 284.11 0 top
NOREF#602  -  []  156.1 280.99 90 top
NOREF#603  -  []  204.64 241.15 90 top
NOREF#604  -  []  198.64 233.37 90 top
NOREF#605  -  []  231.76 167.33 0 top
NOREF#606  -  []  192.25 272.17 0 top
NOREF#607  -  []  151.71 231.3 0 top
NOREF#608  -  []  188.78 244.35 0 top
NOREF#609  -  []  236.54 227 0 top
NOREF#610  -  []  212.87 227.4 90 top
NOREF#611  -  []  150.56 192.78 0 top
NOREF#612  -  []  243.84 274.21 0 top
NOREF#613  -  []  260.83 203.76 90 top
NOREF#614  -  []  155.68 173.69 90 top
NOREF#615  -  []  153.76 195.7 90 top
NOREF#616  -  []  272.87 188.11 90 top
NOREF#617  -  []  192.72 197.6 0 top
NOREF#618  -  []  147.03 231.4 0 top
NOREF#619  -  []  317.15 392.33 90 top
NOREF#620  -  []  187.77 257.6 0 top
NOREF#621  -  []  159.4 267.5 90 top
NOREF#622  -  []  235.49 168.7 90 top
NOREF#623  -  []  267.43 278.27 0 top
NOREF#624  -  []  140.83 201.22 90 top
NOREF#625  -  []  154.39 222.02 90 top
NOREF#626  -  []  189.72 281.62 0 top
NOREF#627  -  []  156.8 220.49 90 top
NOREF#628  -  []  270.88 168.6 90 top
NOREF#629  -  []  224.16 245.63 90 top
NOREF#630  -  []  193.95 191.93 0 top
NOREF#631  -  []  235.17 272.17 0 top
NOREF#632  -  []  243.4 236.38 0 top
NOREF#633  -  []  197.25 256.75 0 top
NOREF#634  -  []  279.4 262.09 0 top
NOREF#635  -  []  199.27 265.58 0 top
NOREF#636  -  []  134.38 204.09 0 top
NOREF#637  -  []  152.11 171.4 0 top
NOREF#638  -  []  268.81 195.7 90 top
NOREF#639  -  []  284.64 181.15 90 top
NOREF#640  -  []  147.77 181.47 0 top
NOREF#641  -  []  203.84 205.58 0 top
NOREF#642  -  []  250.89 202.32 0 top
NOREF#643  -  []  159.27 213.41 90 top
NOREF#644  -  []  289.52 272.86 90 top
NOREF#645  -  []  153.18 184.35 0 top
NOREF#646  -  []  208.54 202.09 0 top
NOREF#647  -  []  261.03 207.69 90 top
NOREF#648  -  []  226.83 251.93 0 top
NOREF#649  -  []  171.25 244.35 0 top
NOREF#650  -  []  270.56 252.78 0 top
NOREF#651  -  []  209.55 237.49 0 top
NOREF#652  -  []  159.22 179.57 90 top
NOREF#653  -  []  213.36 261.22 0 top
NOREF#654  -  []  199.4 273.09 90 top
NOREF#655  -  []  265.41 226.99 90 top
NOREF#656  -  []  150.63 259.3 0 top
NOREF#657  -  []  157.25 196.75 0 top
NOREF#658  -  []  236.7 197.85 90 top
NOREF#659  -  []  193.83 232.21 90 top
NOREF#660  -  []  147.8 209.99 0 top
NOREF#661  -  []  185.61 257.6 0 top
NOREF#662  -  []  197.04 184.35 0 top
NOREF#663  -  []  131.26 184.35 0 top
NOREF#664  -  []  279.27 205.58 0 top
NOREF#665  -  []  196.57 253.35 0 top
NOREF#666  -  []  154.84 18.69 90 top
NOREF#667  -  []  233.39 257.85 90 top
NOREF#668  -  []  224.04 191.93 0 top
NOREF#669  -  []  215.24 261.55 90 top
NOREF#670  -  []  226.43 296.46 90 top
NOREF#671  -  []  214.09 260.42 90 top
NOREF#672  -  []  239.72 223.79 90 top
NOREF#673  -  []  232.13 284.66 0 top
NOREF#674  -  []  180.83 208.59 90 top
NOREF#675  -  []  283.97 272 0 top
NOREF#676  -  []  271.11 198.18 0 top
NOREF#677  -  []  184.16 245.63 90 top
NOREF#678  -  []  268.99 240.62 0 top
NOREF#679  -  []  231.19 228.49 0 top
NOREF#680  -  []  178.95 266.12 0 top
NOREF#681  -  []  220.95 264.09 90 top
NOREF#682  -  []  243.84 271.67 0 top
NOREF#683  -  []  143.49 197.85 90 top
NOREF#684  -  []  156.54 167 0 top
NOREF#685  -  []  146.88 283.95 0 top
NOREF#686  -  []  269.84 224.11 90 top
NOREF#687  -  []  263.49 247.06 90 top
NOREF#688  -  []  145.42 214.72 90 top
NOREF#689  -  []  222.81 246.81 0 top
NOREF#690  -  []  192.11 231.4 0 top
NOREF#691  -  []  186.43 236.47 90 top
NOREF#692  -  []  186.01 184.91 90 top
NOREF#693  -  []  209.55 237.49 0 top
NOREF#694  -  []  281.41 227.9 90 top
NOREF#695  -  []  163.84 260.97 90 top
NOREF#696  -  []  264.04 256.75 0 top
NOREF#697  -  []  174.09 267.27 90 top
NOREF#698  -  []  151.7 283.69 0 top
NOREF#699  -  []  196.57 185.63 0 top
NOREF#700  -  []  288.54 267.5 90 top
NOREF#701  -  []  158.64 173.37 90 top
NOREF#702  -  []  181.6 234.15 0 top
NOREF#703  -  []  268.99 191.93 0 top
NOREF#704  -  []  269.72 286.19 0 top
NOREF#705  -  []  206.32 212.22 0 top
NOREF#706  -  []  156.1 220.99 90 top
NOREF#707  -  []  230.2 389.27 90 top
NOREF#708  -  []  203.84 264.78 90 top
NOREF#709  -  []  157.37 196.43 90 top
NOREF#710  -  []  276.1 211.85 90 top
NOREF#711  -  []  236.8 214.65 90 top
NOREF#712  -  []  203.84 265.58 0 top
NOREF#713  -  []  231.98 280.75 90 top
NOREF#714  -  []  208.42 204.78 90 top
NOREF#715  -  []  237.59 235.77 0 top
NOREF#716  -  []  146.16 253.35 0 top
NOREF#717  -  []  157.04 184.35 0 top
NOREF#718  -  []  174.51 203.76 0 top
NOREF#719  -  []  164.61 234.89 90 top
NOREF#720  -  []  149.84 284.11 90 top
NOREF#721  -  []  258.95 208.91 0 top
NOREF#722  -  []  229.84 279.54 90 top
NOREF#723  -  []  275.05 218.82 0 top
NOREF#724  -  []  187.77 252.78 0 top
NOREF#725  -  []  288.54 264.45 90 top
NOREF#726  -  []  196.45 247.71 0 top
NOREF#727  -  []  198.91 232.21 90 top
NOREF#728  -  []  140.95 266.12 90 top
NOREF#729  -  []  199.27 267.82 90 top
NOREF#730  -  []  273.6 222.39 0 top
NOREF#731  -  []  143.49 193.03 90 top
NOREF#732  -  []  266.16 226.14 90 top
NOREF#733  -  []  208.42 201.77 0 top
NOREF#734  -  []  171.22 294.24 90 top
NOREF#735  -  []  275.17 216.75 0 top
NOREF#736  -  []  243.97 202.09 0 top
NOREF#737  -  []  243.04 236.5 90 top
NOREF#738  -  []  277.18 236.17 90 top
NOREF#739  -  []  151.53 233.37 90 top
NOREF#740  -  []  199.4 210.55 90 top
NOREF#741  -  []  258.95 204.09 0 top
NOREF#742  -  []  226.96 256.43 90 top
NOREF#743  -  []  199.22 255.7 90 top
NOREF#744  -  []  281.75 262.32 0 top
NOREF#745  -  []  227.77 197.6 0 top
NOREF#746  -  []  221.55 209.94 90 top
NOREF#747  -  []  219.08 203.76 0 top
NOREF#748  -  []  239.4 212 0 top
NOREF#749  -  []  156.57 182.05 0 top
NOREF#750  -  []  209.55 237.49 90 top
NOREF#751  -  []  191.87 456.29 0 top
NOREF#752  -  []  233.18 271.85 90 top
NOREF#753  -  []  237.25 256.75 0 top
NOREF#754  -  []  259.55 234.49 0 top
NOREF#755  -  []  288.54 260.64 90 top
NOREF#756  -  []  279.4 207.5 90 top
NOREF#757  -  []  227.77 241.47 0 top
NOREF#758  -  []  248.42 267.82 90 top
NOREF#759  -  []  277.71 172.86 0 top
NOREF#760  -  []  242.26 176.17 90 top
NOREF#761  -  []  294.09 204.23 90 top
NOREF#762  -  []  153.18 244.35 0 top
NOREF#763  -  []  163.04 176.5 90 top
NOREF#764  -  []  168.42 208.62 0 top
NOREF#765  -  []  271.53 233.37 90 top
NOREF#766  -  []  190.48 175.77 0 top
NOREF#767  -  []  190.97 195.7 90 top
NOREF#768  -  []  180.83 203.76 90 top
NOREF#769  -  []  189.12 256.43 90 top
NOREF#770  -  []  207.95 226.12 90 top
NOREF#771  -  []  171.05 185.49 90 top
NOREF#772  -  []  153.76 190.88 90 top
NOREF#773  -  []  237.71 173.69 0 top
NOREF#774  -  []  250.89 262.32 0 top
NOREF#775  -  []  173.62 289.09 90 top
NOREF#776  -  []  176.38 264.09 90 top
NOREF#777  -  []  196.52 221.12 0 top
NOREF#778  -  []  186.16 272.17 90 top
NOREF#779  -  []  255.84 202.57 90 top
NOREF#780  -  []  233.18 222.26 90 top
NOREF#781  -  []  192.66 166.36 90 top
NOREF#782  -  []  282.26 176.17 90 top
NOREF#783  -  []  148.35 223.79 90 top
NOREF#784  -  []  283.97 265.9 0 top
NOREF#785  -  []  227.8 269.99 0 top
NOREF#786  -  []  168.54 268.95 0 top
NOREF#787  -  []  195.68 233.69 0 top
NOREF#788  -  []  159.27 214.21 0 top
NOREF#789  -  []  182.81 252.78 0 top
NOREF#790  -  []  169.17 291.95 0 top
NOREF#791  -  []  153.03 172.1 0 top
NOREF#792  -  []  157.37 191.6 90 top
NOREF#793  -  []  240.13 396.29 0 top
NOREF#794  -  []  139.55 234.49 0 top
NOREF#795  -  []  166.32 269.17 0 top
NOREF#796  -  []  276.57 245.63 90 top
NOREF#797  -  []  146.01 184.91 90 top
NOREF#798  -  []  163.97 265.9 0 top
NOREF#799  -  []  283.84 271.67 0 top
NOREF#800  -  []  140.83 205.79 90 top
NOREF#801  -  []  199.4 265.9 0 top
NOREF#802  -  []  236.1 276.42 90 top
NOREF#803  -  []  273.98 238.07 0 top
NOREF#804  -  []  233.6 226.96 0 top
NOREF#805  -  []  235.96 168.6 90 top
NOREF#806  -  []  256.26 263.76 90 top
NOREF#807  -  []  189.72 286.19 0 top
NOREF#808  -  []  273.76 190.88 90 top
NOREF#809  -  []  171.65 293.3 90 top
NOREF#810  -  []  239.65 212.56 0 top
NOREF#811  -  []  242.85 297.22 0 top
NOREF#812  -  []  188.32 185.63 90 top
NOREF#813  -  []  157.92 236.37 90 top
NOREF#814  -  []  182.87 286.99 0 top
NOREF#815  -  []  236.45 247.71 0 top
NOREF#816  -  []  181.55 207.14 90 top
NOREF#817  -  []  202.2 238.35 0 top
NOREF#818  -  []  163.97 272 0 top
NOREF#819  -  []  239.4 213.09 90 top
NOREF#820  -  []  261.03 267.69 90 top
NOREF#821  -  []  209.52 267.27 90 top
NOREF#822  -  []  154.63 279.22 90 top
NOREF#823  -  []  273.83 172.21 90 top
NOREF#824  -  []  146.43 222.5 90 top
NOREF#825  -  []  179.08 261.22 0 top
NOREF#826  -  []  151.24 197.85 90 top
NOREF#827  -  []  194.07 256.43 90 top
NOREF#828  -  []  196.57 245.63 0 top
NOREF#829  -  []  161.12 188.11 90 top
NOREF#830  -  []  263.36 258.18 0 top
NOREF#831  -  []  203.97 262.09 0 top
NOREF#832  -  []  253.62 229.09 90 top
NOREF#833  -  []  270.41 168.7 90 top
NOREF#834  -  []  178.95 264.09 0 top
NOREF#835  -  []  225.41 273.02 90 top
NOREF#836  -  []  156.02 236.37 0 top
NOREF#837  -  []  260.59 244.98 90 top
NOREF#838  -  []  231.11 193.35 0 top
NOREF#839  -  []  144.71 241.71 90 top
NOREF#840  -  []  281.75 274.76 0 top
NOREF#841  -  []  157.03 238.07 0 top
NOREF#842  -  []  267.43 218.27 0 top
NOREF#843  -  []  164.95 210.32 90 top
NOREF#844  -  []  221.55 207.14 90 top
NOREF#845  -  []  261.59 248.12 0 top
NOREF#846  -  []  207.98 226.38 90 top
NOREF#847  -  []  242.26 236.17 90 top
NOREF#848  -  []  268.44 197.85 90 top
NOREF#849  -  []  204.95 200.42 90 top
NOREF#850  -  []  196.02 181.47 0 top
NOREF#851  -  []  199.22 190.88 90 top
NOREF#852  -  []  269.84 284.11 0 top
NOREF#853  -  []  151.11 200.17 90 top
NOREF#854  -  []  264.04 196.75 0 top
NOREF#855  -  []  176.38 204.09 90 top
NOREF#856  -  []  191.19 288.49 0 top
NOREF#857  -  []  138.95 264.09 0 top
NOREF#858  -  []  216.26 203.76 90 top
NOREF#859  -  []  142.88 213.02 0 top
NOREF#860  -  []  228.19 247.71 0 top
NOREF#861  -  []  277.92 250.01 0 top
NOREF#862  -  []  180.95 261.55 90 top
NOREF#863  -  []  134.38 264.09 0 top
NOREF#864  -  []  279.4 213.09 90 top
NOREF#865  -  []  149.84 273.7 0 top
NOREF#866  -  []  226.7 223.05 90 top
NOREF#867  -  []  190.6 233.69 90 top
NOREF#868  -  []  164.44 292.28 90 top
NOREF#869  -  []  131.05 229.49 0 top
NOREF#870  -  []  168.42 268.62 0 top
NOREF#871  -  []  152.25 222.59 0 top
NOREF#872  -  []  225.61 192.78 0 top
NOREF#873  -  []  245.38 226.23 0 top
NOREF#874  -  []  130.02 214.45 0 top
NOREF#875  -  []  268.44 193.03 90 top
NOREF#876  -  []  159.4 212 0 top
NOREF#877  -  []  144.71 252.5 90 top
NOREF#878  -  []  143.49 247.06 90 top
NOREF#879  -  []  163.97 202.09 0 top
NOREF#880  -  []  211.05 289.49 0 top
NOREF#881  -  []  146.16 200.17 90 top
NOREF#882  -  []  174.43 232.23 0 top
NOREF#883  -  []  144.04 191.93 0 top
NOREF#884  -  []  231.71 171.3 0 top
NOREF#885  -  []  157.25 180.62 0 top
NOREF#886  -  []  193.18 277.69 90 top
NOREF#887  -  []  191.87 396.29 0 top
NOREF#888  -  []  268.32 242.05 0 top
NOREF#889  -  []  165.04 233.3 90 top
NOREF#890  -  []  248.54 265.9 0 top
NOREF#891  -  []  109.55 389.27 90 top
NOREF#892  -  []  271.73 172.54 0 top
NOREF#893  -  []  279.72 219.22 90 top
NOREF#894  -  []  152.63 232.86 0 top
NOREF#895  -  []  173.64 239.09 0 top
NOREF#896  -  []  246.32 266.13 0 top
NOREF#897  -  []  250.89 266.13 0 top
NOREF#898  -  []  138.83 292.23 0 top
NOREF#899  -  []  283.84 273.41 90 top
NOREF#900  -  []  283.84 264.78 90 top
NOREF#901  -  []  199.27 268.62 0 top
NOREF#902  -  []  188.78 222.65 0 top
NOREF#903  -  []  276.45 187.71 0 top
NOREF#904  -  []  181.6 308.11 0 top
NOREF#905  -  []  227.8 205.39 90 top
NOREF#906  -  []  119.48 456.29 0 top
NOREF#907  -  []  237.5 245.31 90 top
NOREF#908  -  []  197.92 250.01 0 top
NOREF#909  -  []  188.44 241.72 90 top
NOREF#910  -  []  258.35 207.01 0 top
NOREF#911  -  []  151.91 256.43 90 top
NOREF#912  -  []  195.96 168.6 90 top
NOREF#913  -  []  263.36 253.35 0 top
NOREF#914  -  []  195.17 221.32 0 top
NOREF#915  -  []  256.55 220.49 0 top
NOREF#916  -  []  289.52 260.42 90 top
NOREF#917  -  []  175.11 261.22 90 top
NOREF#918  -  []  163.97 264.45 90 top
NOREF#919  -  []  279.4 210.55 90 top
NOREF#920  -  []  211.65 293.3 90 top
NOREF#921  -  []  234.07 196.43 90 top
NOREF#922  -  []  163.97 260.64 90 top
NOREF#923  -  []  196.57 242.05 0 top
NOREF#924  -  []  191.98 286.59 90 top
NOREF#925  -  []  235.15 236.17 90 top
NOREF#926  -  []  196.7 253.03 90 top
NOREF#927  -  []  270.77 279.22 90 top
NOREF#928  -  []  138.95 208.91 0 top
NOREF#929  -  []  179.08 201.22 0 top
NOREF#930  -  []  204.95 210.32 90 top
NOREF#931  -  []  288.54 265.9 0 top
NOREF#932  -  []  283.97 273.09 90 top
NOREF#933  -  []  229.84 284.11 90 top
NOREF#934  -  []  248.42 260.97 90 top
NOREF#935  -  []  233.27 198.18 0 top
NOREF#936  -  []  228.32 182.05 0 top
NOREF#937  -  []  281.44 184.35 0 top
NOREF#938  -  []  248.54 202.09 0 top
NOREF#939  -  []  271.19 223.92 0 top
NOREF#940  -  []  161.75 262.32 0 top
NOREF#941  -  []  155.96 228.6 90 top
NOREF#942  -  []  237.03 178.07 0 top
NOREF#943  -  []  270.97 190.88 90 top
NOREF#944  -  []  227.77 181.47 0 top
NOREF#945  -  []  193.6 226.96 0 top
NOREF#946  -  []  240.23 176.17 90 top
NOREF#947  -  []  239.27 268.62 0 top
NOREF#948  -  []  272.25 212.18 0 top
NOREF#949  -  []  231.73 172.54 0 top
NOREF#950  -  []  276.7 197.85 90 top
NOREF#951  -  []  152.25 212.18 90 top
NOREF#952  -  []  234.07 256.43 90 top
NOREF#953  -  []  276.7 241.72 90 top
NOREF#954  -  []  233.18 277.69 90 top
NOREF#955  -  []  148.32 242.05 0 top
NOREF#956  -  []  187.77 192.78 0 top
NOREF#957  -  []  261.59 308.11 0 top
NOREF#958  -  []  214.43 232.23 0 top
NOREF#959  -  []  156.7 197.85 90 top
NOREF#960  -  []  266.69 237.02 90 top
NOREF#961  -  []  195.05 274.25 0 top
NOREF#962  -  []  250.89 209.17 0 top
NOREF#963  -  []  260.59 184.98 90 top
NOREF#964  -  []  196.61 233.37 90 top
NOREF#965  -  []  163.97 262.09 0 top
NOREF#966  -  []  251.21 294.89 90 top
NOREF#967  -  []  138.35 211.84 0 top
NOREF#968  -  []  183.36 187.38 0 top
NOREF#969  -  []  266.01 195.7 90 top
NOREF#970  -  []  163.97 204.45 90 top
NOREF#971  -  []  186.83 251.93 0 top
NOREF#972  -  []  231.95 178.07 0 top
NOREF#973  -  []  267.99 238.35 0 top
NOREF#974  -  []  228.32 245.63 90 top
NOREF#975  -  []  192.25 278.02 90 top
NOREF#976  -  []  218.85 241.15 90 top
NOREF#977  -  []  279.72 279.22 90 top
NOREF#978  -  []  279.27 207.82 90 top
NOREF#979  -  []  136.26 203.76 90 top
NOREF#980  -  []  279.27 264.78 90 top
NOREF#981  -  []  261.85 246.47 0 top
NOREF#982  -  []  228.95 206.89 0 top
NOREF#983  -  []  178.97 271.91 90 top
NOREF#984  -  []  168.42 261.77 0 top
NOREF#985  -  []  276.84 167.33 0 top
NOREF#986  -  []  250.02 214.45 0 top
NOREF#987  -  []  157.04 244.35 0 top
NOREF#988  -  []  215.02 268.14 90 top
NOREF#989  -  []  211.14 458.49 0 top
NOREF#990  -  []  205.38 226.23 0 top
NOREF#991  -  []  201.84 235.2 0 top
NOREF#992  -  []  192.25 218.02 0 top
NOREF#993  -  []  135.66 184.35 0 top
NOREF#994  -  []  198.64 173.37 90 top
NOREF#995  -  []  202.57 231.95 0 top
NOREF#996  -  []  226.16 286.14 90 top
NOREF#997  -  []  148.32 245.63 90 top
NOREF#998  -  []  246.32 202.32 0 top
NOREF#999  -  []  156.57 245.63 90 top
NOREF#1000  -  []  138.56 246.51 0 top
NOREF#1001  -  []  159.22 190.88 90 top
NOREF#1002  -  []  142.81 247.68 0 top
NOREF#1003  -  []  124.11 392.33 90 top
NOREF#1004  -  []  237.37 251.6 90 top
NOREF#1005  -  []  213.45 244.35 0 top
NOREF#1006  -  []  235.17 281.32 0 top
NOREF#1007  -  []  267.99 178.35 0 top
NOREF#1008  -  []  268.35 217.95 90 top
NOREF#1009  -  []  138.74 83.81 0 top
NOREF#1010  -  []  88.14 134.87 0 top
NOREF#1011  -  []  187.3 286.19 0 top
NOREF#1012  -  []  106.58 18.69 90 top
NOREF#1013  -  []  209.17 231.95 0 top
NOREF#1014  -  []  144.16 185.63 90 top
NOREF#1015  -  []  261.55 269.94 90 top
NOREF#1016  -  []  171.05 245.49 90 top
NOREF#1017  -  []  265.09 257.49 90 top
NOREF#1018  -  []  152.13 274.25 0 top
NOREF#1019  -  []  159.44 179.15 0 top
NOREF#1020  -  []  144.04 185.96 0 top
NOREF#1021  -  []  133.68 389.27 90 top
NOREF#1022  -  []  201.75 209.17 0 top
NOREF#1023  -  []  236.84 167.33 0 top
NOREF#1024  -  []  193.39 197.85 90 top
NOREF#1025  -  []  163.84 207.82 90 top
NOREF#1026  -  []  227.8 204.99 90 top
NOREF#1027  -  []  188.32 245.63 90 top
NOREF#1028  -  []  169.17 231.95 0 top
NOREF#1029  -  []  148.78 228.49 0 top
NOREF#1030  -  []  156.84 227.33 0 top
NOREF#1031  -  []  203.97 267.5 90 top
NOREF#1032  -  []  215.02 208.14 90 top
NOREF#1033  -  []  146.88 289.79 0 top
NOREF#1034  -  []  219.55 180.49 90 top
NOREF#1035  -  []  147.77 192.78 0 top
NOREF#1036  -  []  239.4 207.5 90 top
NOREF#1037  -  []  284.95 270.32 90 top
NOREF#1038  -  []  272.13 224.66 0 top
NOREF#1039  -  []  228.95 266.89 0 top
NOREF#1040  -  []  169.52 210.32 90 top
NOREF#1041  -  []  270.6 233.69 0 top
NOREF#1042  -  []  170.89 202.32 0 top
NOREF#1043  -  []  195.17 272.17 0 top
NOREF#1044  -  []  156.57 198.18 0 top
NOREF#1045  -  []  122.2 178.35 0 top
NOREF#1046  -  []  199.4 205.9 0 top
NOREF#1047  -  []  14.6 372.12 0 top
NOREF#1048  -  []  309.55 14.59 90 top
NOREF#1049  -  []  199.72 279.22 90 top
NOREF#1050  -  []  253.78 207.01 0 top
NOREF#1051  -  []  156.57 258.18 0 top
NOREF#1052  -  []  191.79 191.93 0 top
NOREF#1053  -  []  151.7 288.26 0 top
NOREF#1054  -  []  139.08 261.22 0 top
NOREF#1055  -  []  199.27 260.97 90 top
NOREF#1056  -  []  187.3 226.19 0 top
NOREF#1057  -  []  249.52 264.23 90 top
NOREF#1058  -  []  231.19 283.92 0 top
NOREF#1059  -  []  145.42 213.02 90 top
NOREF#1060  -  []  182.87 226.99 0 top
NOREF#1061  -  []  216.63 232.23 0 top
NOREF#1062  -  []  195.96 228.6 90 top
NOREF#1063  -  []  273.6 286.96 0 top
NOREF#1064  -  []  220.83 263.76 90 top
NOREF#1065  -  []  253.36 201.22 0 top
NOREF#1066  -  []  226.16 212.17 90 top
NOREF#1067  -  []  208.42 200.97 90 top
NOREF#1068  -  []  114.62 458.49 0 top
NOREF#1069  -  []  196.79 231.3 0 top
NOREF#1070  -  []  279.4 205.9 0 top
NOREF#1071  -  []  276.57 182.05 0 top
NOREF#1072  -  []  307.65 17.78 0 top
NOREF#1073  -  []  218.95 206.12 0 top
NOREF#1074  -  []  239.72 274.65 90 top
NOREF#1075  -  []  138.85 241.15 90 top
NOREF#1076  -  []  272.72 192.78 0 top
NOREF#1077  -  []  279.4 274.54 0 top
NOREF#1078  -  []  141.85 246.47 0 top
NOREF#1079  -  []  209.49 280.89 0 top
NOREF#1080  -  []  191.91 196.43 90 top
NOREF#1081  -  []  146.96 191.6 90 top
NOREF#1082  -  []  233.6 216.55 0 top
NOREF#1083  -  []  181.85 232.5 0 top
NOREF#1084  -  []  239.4 202.09 0 top
NOREF#1085  -  []  197.25 240.62 0 top
NOREF#1086  -  []  203.97 260.64 90 top
NOREF#1087  -  []  243.97 270.55 90 top
NOREF#1088  -  []  158.11 172.1 0 top
NOREF#1089  -  []  132.55 224.49 0 top
NOREF#1090  -  []  155.56 235.77 0 top
NOREF#1091  -  []  191.24 257.85 90 top
NOREF#1092  -  []  147.3 220.35 0 top
NOREF#1093  -  []  277.5 245.31 90 top
NOREF#1094  -  []  233.94 256.75 0 top
NOREF#1095  -  []  186.16 193.35 0 top
NOREF#1096  -  []  214.04 270.63 90 top
NOREF#1097  -  []  166.32 262.32 0 top
NOREF#1098  -  []  162.26 236.17 90 top
NOREF#1099  -  []  229.55 248.99 90 top
NOREF#1100  -  []  283.84 261.77 0 top
NOREF#1101  -  []  176.98 265.11 90 top
NOREF#1102  -  []  233.03 172.1 0 top
NOREF#1103  -  []  176.26 263.76 90 top
NOREF#1104  -  []  149.72 221.62 0 top
